# Altium PCB SOM_PCB_BLUETECHNIX.PcbDoc (part 6 of 8)
Units mil, origin at the board's own origin, x right, y up, seen from the top; angles counter-clockwise.
Board outline 1225 x 1620 mil, 8 copper layers (Top Layer, Int1 (Sign), Int2 (GND), Int3 (Sign), Int4 (Sign), Int5 (PWR), Int6 (Sign), Bottom Layer), stack 66.2 mil thick; 65 components, 201 nets, 938 pads, 497 vias.
Unrouted connection lines stored in the file: 25.
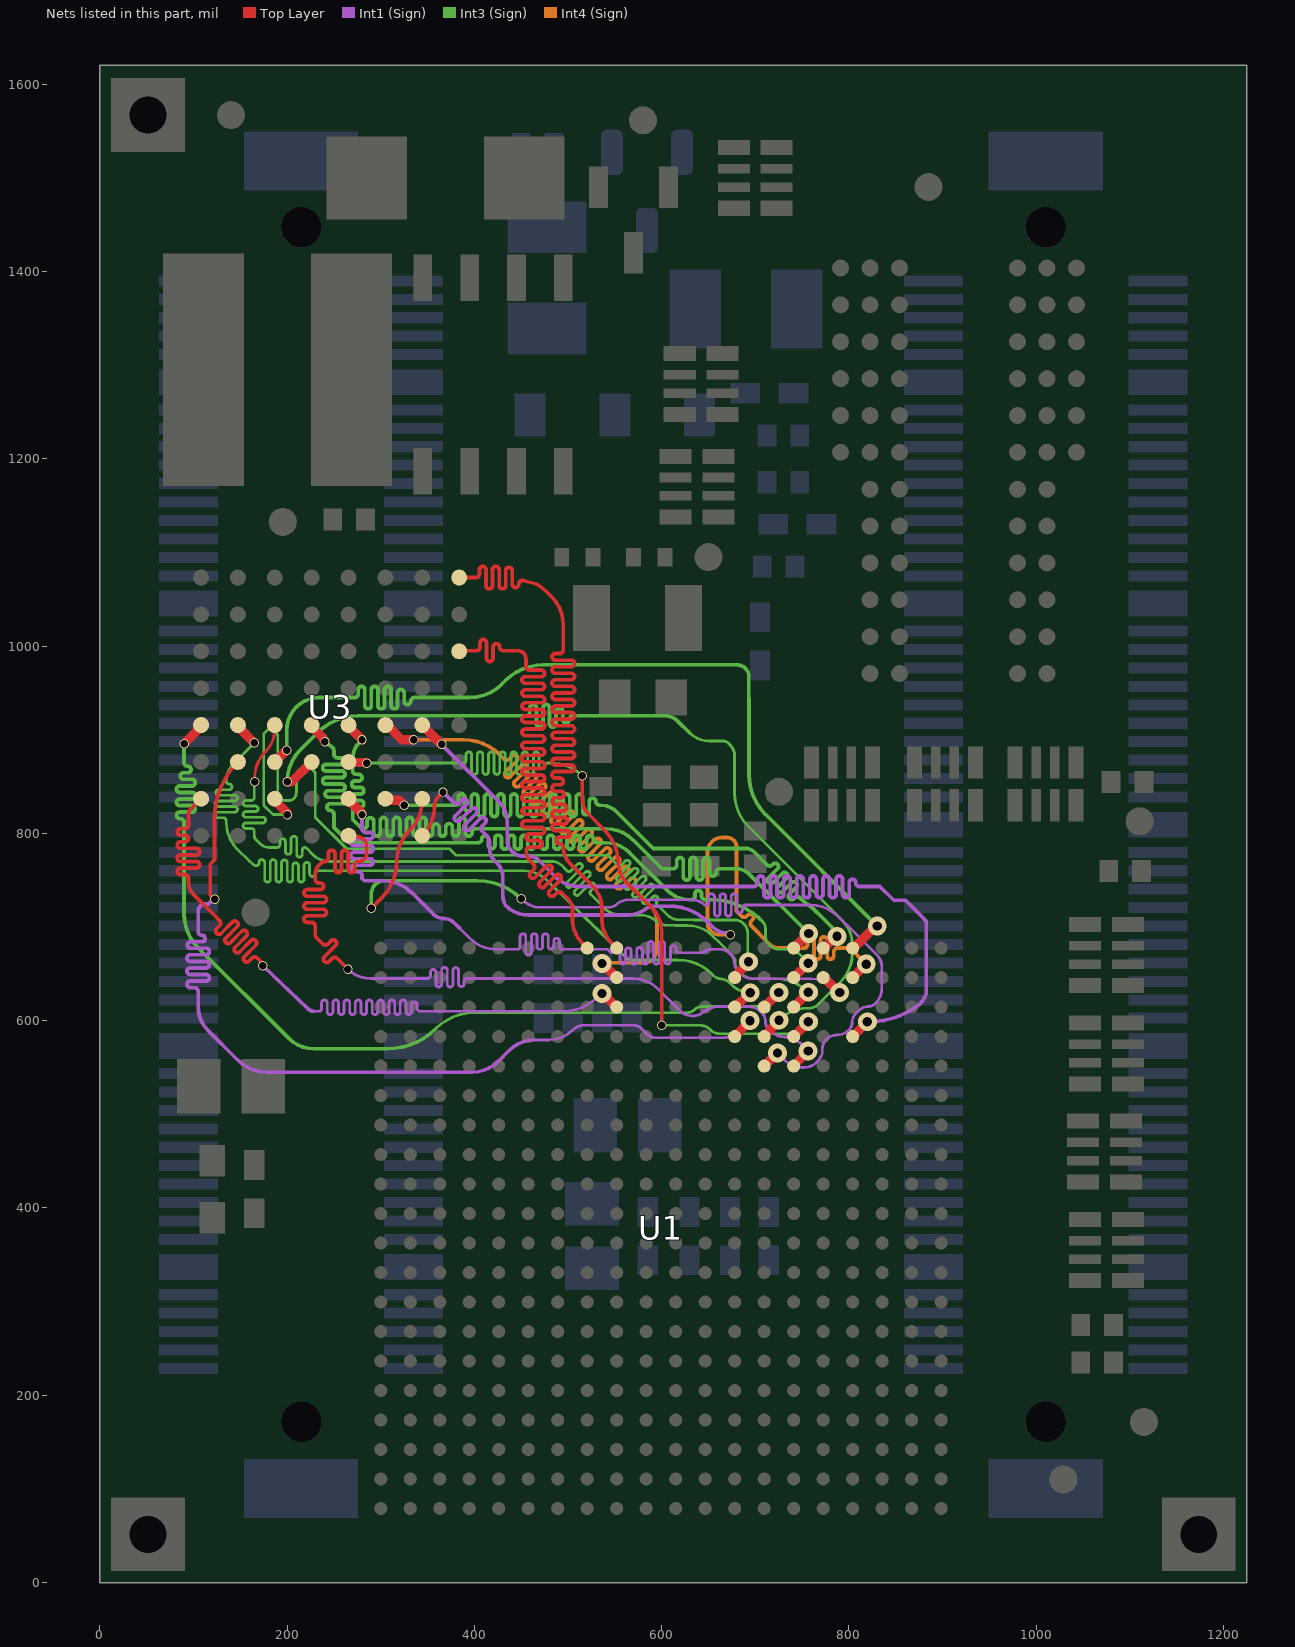
[diagram p11: the nets of this part, all layers, seen from the top]

## Via types
v1: diameter 20, hole 10, Top Layer to Int2 (GND), tented both sides, 68 vias
v2: diameter 10, hole 8, Top Layer to Int3 (Sign), tented both sides, 53 vias
v3: diameter 20, hole 10, Top Layer to Bottom Layer, tented both sides, 44 vias
v4: diameter 10, hole 8, Top Layer to Int1 (Sign), tented both sides, 41 vias
v5: diameter 20, hole 10, Top Layer to Int5 (PWR), tented both sides, 40 vias
v6: diameter 10, hole 8, Top Layer to Int4 (Sign), tented both sides, 33 vias
v7: diameter 20, hole 10, Top Layer to Int3 (Sign), tented both sides, 25 vias
v8: diameter 24, hole 12, Int6 (Sign) to Bottom Layer, tented both sides, 22 vias
v9: diameter 20, hole 10, Top Layer to Int4 (Sign), tented both sides, 19 vias
v10: diameter 24, hole 12, Int4 (Sign) to Bottom Layer, tented both sides, 17 vias
v11: diameter 24, hole 12, Int2 (GND) to Bottom Layer, tented both sides, 15 vias
v12: diameter 20, hole 10, Top Layer to Int1 (Sign), tented both sides, 13 vias
v13: diameter 24, hole 12, Top Layer to Int6 (Sign), tented both sides, 11 vias
v14: diameter 24, hole 12, Top Layer to Int4 (Sign), tented both sides, 10 vias
v15: diameter 24, hole 12, Top Layer to Int3 (Sign), tented both sides, 8 vias
v16: diameter 11, hole 8, Top Layer to Int1 (Sign), tented both sides, 8 vias
v17: diameter 10, hole 8, Top Layer to Bottom Layer, tented both sides, 7 vias
v18: diameter 20, hole 10, Top Layer to Int6 (Sign), tented both sides, 7 vias
v19: diameter 10, hole 8, Top Layer to Int6 (Sign), tented both sides, 6 vias
v20: diameter 10, hole 8, Int4 (Sign) to Bottom Layer, tented both sides, 6 vias
v21: diameter 24, hole 12, Int1 (Sign) to Bottom Layer, tented both sides, 5 vias
v22: diameter 24, hole 12, Top Layer to Int2 (GND), tented both sides, 5 vias
v23: diameter 10, hole 7, Top Layer to Int1 (Sign), tented both sides, 4 vias
v24: diameter 10, hole 8, Top Layer to Int2 (GND), tented both sides, 4 vias
v25: diameter 10, hole 8, Int2 (GND) to Bottom Layer, tented both sides, 4 vias
v26: diameter 24, hole 12, Int3 (Sign) to Bottom Layer, tented both sides, 4 vias
v27: diameter 24, hole 12, Top Layer to Bottom Layer, tented both sides, 4 vias
v28: diameter 10, hole 8, Int5 (PWR) to Bottom Layer, tented both sides, 3 vias
v29: diameter 20, hole 10, Int2 (GND) to Bottom Layer, tented both sides, 2 vias
v30: diameter 10, hole 8, Int6 (Sign) to Bottom Layer, tented both sides, 2 vias
v31: diameter 10, hole 8, Top Layer to Bottom Layer, 1 vias
v32: diameter 22, hole 12, Int2 (GND) to Bottom Layer, tented both sides, 1 vias
v33: diameter 24, hole 10, Int2 (GND) to Bottom Layer, tented both sides, 1 vias
v34: diameter 20, hole 12, Top Layer to Int5 (PWR), tented both sides, 1 vias
v35: diameter 20, hole 12, Top Layer to Int2 (GND), tented both sides, 1 vias
v36: diameter 24, hole 12, Top Layer to Int5 (PWR), tented both sides, 1 vias
v37: diameter 24, hole 12, Top Layer to Int1 (Sign), tented both sides, 1 vias

## Nets (pads, with @x,y where several pads share a name; then routed paths per layer and width w, separated by ;. In a path a pad name is that pad's centre, name@x,y a point inside that pad or via, vN(x,y) a via of type N, cw(c..) or ccw(c..) an arc to the next point about the centre after c; other vN are vias at no path point) (continued)
FLASH_A21: U1.A8 U3.C8 | length 1132.7
  Top Layer w4: U3.C8@386.23,991.88 U3.C8@383.74,994.37 384.37,995 400,995 402,995 ccw(c402,999) 406,999 406,1003.5 cw(c409.5,1003.5) 413,1003.5 413,986.96 ccw(c416.5,986.96) 420,986.96 420,999 cw(c423.5,999) 427,999 ccw(c431,999) 431,995 442.5,995 446.46,995 cw(c446.46,986.46) 452.49,992.51 cw(c446.46,986.46) 455,986.46 455,980.36 455,978.36 ccw(c459,978.36) 459,974.36 471.38,974.36 cw(c471.38,970.86) 471.38,967.36 454.38,967.36 ccw(c454.38,963.86) 454.38,960.36 471.38,960.36 cw(c471.38,956.86) 471.38,953.36 454.38,953.36 ccw(c454.38,949.86) 454.38,946.36 471.38,946.36 cw(c471.38,942.86) 471.38,939.36 454.38,939.36 ccw(c454.38,935.86) 454.38,932.36 471.38,932.36 cw(c471.38,928.86) 471.38,925.36 454.38,925.36 ccw(c454.38,921.86) 454.38,918.36 471.38,918.36 cw(c471.38,914.86) 471.38,911.36 454.38,911.36 ccw(c454.38,907.86) 454.38,904.36 471.38,904.36 cw(c471.38,900.86) 471.38,897.36 454.38,897.36 ccw(c454.38,893.86) 454.38,890.36 471.38,890.36 cw(c471.38,886.86) 471.38,883.36 454.38,883.36 ccw(c454.38,879.86) 454.38,876.36 471.38,876.36 cw(c471.38,872.86) 471.38,869.36 454.38,869.36 ccw(c454.38,865.86) 454.38,862.36 471.38,862.36 cw(c471.38,858.86) 471.38,855.36 454.38,855.36 ccw(c454.38,851.86) 454.38,848.36 471.38,848.36 cw(c471.38,844.86) 471.38,841.36 454.38,841.36 ccw(c454.38,837.86) 454.38,834.36 471.38,834.36 cw(c471.38,830.86) 471.38,827.36 454.38,827.36 ccw(c454.38,823.86) 454.38,820.36 471.38,820.36 cw(c471.38,816.86) 471.38,813.36 454.38,813.36 ccw(c454.38,809.86) 454.38,806.36 471.38,806.36 cw(c471.38,802.86) 471.38,799.36 458.5,799.36 ccw(c458.5,795.86) 458.5,792.36 469.08,792.36 cw(c469.08,788.86) 469.08,785.36 459.35,785.36 ccw(c459.35,781.36) 455.44,780.51 456.63,775.02 ccw(c473.26,782.56) 457.69,773.02 ccw(c473.26,782.56) 460.34,769.66 ; 457.52,772.48 460.34,769.66 ; U1.A8@520.51,677.48 515.02,682.98 cw(c539.77,707.73) 504.76,707.73 504.76,718.33 ccw(c488.1,718.33) 499.9,730.1 495,735 493.59,736.41 ccw(c490.76,733.59) 487.93,736.41 485.3,733.79 cw(c482.83,736.26) 480.35,733.79 cw(c482.83,736.26) 480.35,738.74 491.82,750.2 ccw(c489.34,752.68) 491.82,755.15 ccw(c489.34,752.68) 486.87,755.15 474.85,743.13 cw(c472.37,745.61) 469.9,743.13 cw(c472.37,745.61) 469.9,748.08 481.92,760.1 ccw(c479.44,762.58) 481.92,765.05 ccw(c479.44,762.58) 476.97,765.05 464.95,753.03 cw(c462.47,755.51) 460,753.03 cw(c462.47,755.51) 460,757.98 463.18,761.16 ccw(c460.35,763.99) 463.18,766.82 460.34,769.66
  Top Layer w10: U1.A8@520.4,677.48 U1.A8@520.51,677.48
FLASH_A22: U1.A9 U3.A8 | length 1124.9
  Top Layer w4: U3.A8@383.74,1073.11 399.43,1073.11 401.43,1073.11 ccw(c401.43,1077.11) 405.43,1077.11 405.43,1081.61 cw(c408.93,1081.61) 412.43,1081.61 412.43,1064.61 ccw(c415.93,1064.61) 419.43,1064.61 419.43,1081.61 cw(c422.93,1081.61) 426.43,1081.61 426.43,1064.61 ccw(c429.93,1064.61) 433.43,1064.61 433.43,1080.57 cw(c436.93,1080.57) 440.43,1080.57 440.43,1066.06 ccw(c443.93,1066.06) 447.43,1066.06 cw(c451.43,1066.06) 452.42,1069.93 465.38,1066.62 cw(c440,1020.26) 467.38,1065.47 cw(c440,1020.26) 477.37,1057.63 482.63,1052.37 cw(c452.75,1022.5) 495,1022.5 495,1005 495,996 cw(c491,996) 491,992 486.5,992 ccw(c486.5,988.5) 486.5,985 503.5,985 cw(c503.5,981.5) 503.5,978 486.5,978 ccw(c486.5,974.5) 486.5,971 503.5,971 cw(c503.5,967.5) 503.5,964 486.5,964 ccw(c486.5,960.5) 486.5,957 503.5,957 cw(c503.5,953.5) 503.5,950 486.5,950 ccw(c486.5,946.5) 486.5,943 503.5,943 cw(c503.5,939.5) 503.5,936 486.5,936 ccw(c486.5,932.5) 486.5,929 503.5,929 cw(c503.5,925.5) 503.5,922 486.5,922 ccw(c486.5,918.5) 486.5,915 503.5,915 cw(c503.5,911.5) 503.5,908 486.5,908 ccw(c486.5,904.5) 486.5,901 503.5,901 cw(c503.5,897.5) 503.5,894 486.5,894 ccw(c486.5,890.5) 486.5,887 503.5,887 cw(c503.5,883.5) 503.5,880 486.5,880 ccw(c486.5,876.5) 486.5,873 503.5,873 cw(c503.5,869.5) 503.5,866 486.5,866 ccw(c486.5,862.5) 486.5,859 491.5,859 cw(c491.5,855.5) 491.5,852 486.5,852 ccw(c486.5,848.5) 486.5,845 492.36,845 cw(c492.36,841.5) 492.36,838 486.5,838 ccw(c486.5,834.5) 486.5,831 495,831 cw(c495,827.5) 495,824 486.5,824 ccw(c486.5,820.5) 486.5,817 495.83,817 cw(c495.83,813.5) 495.83,810 486.5,810 ccw(c486.5,806.5) 486.5,803 498.54,803 cw(c498.54,799.5) 498.54,796 491,796 ccw(c491,792.5) 491,789 cw(c491,785) 495,785 ccw(c519.14,785) 502.06,767.94 514.97,755.03 526.56,743.44 cw(c503.09,720) 536.26,720 536.26,707.73 ccw(c571.27,707.73) 546.51,682.98 U1.A9@552.01,677.48
  Top Layer w10: U1.A9@551.89,677.48 U1.A9@552.01,677.48
FLASH_A23: U1.C9 U3.G1 | length 1107.7
  Top Layer w4: 100.17,734.83 cw(c113.54,748.17) 94.65,748.17 94.65,750 94.65,752 ccw(c90.65,752) 90.65,756 86.15,756 cw(c86.15,759.5) 86.15,763 103.15,763 ccw(c103.15,766.5) 103.15,770 86.15,770 cw(c86.15,773.5) 86.15,777 103.15,777 ccw(c103.15,780.5) 103.15,784 86.15,784 cw(c86.15,787.5) 86.15,791 91.15,791 ccw(c91.15,794.5) 91.15,798 86.15,798 cw(c86.15,801.5) 86.15,805 90.65,805 ccw(c90.65,809) 94.65,809 94.65,819.79 cw(c103.33,819.79) 97.19,825.93 U3.G1@108.15,836.89 ; 100.18,734.82 122.25,712.75 127.92,707.08 cw(c125.09,704.25) 127.92,701.42 124.74,698.24 ccw(c127.21,695.77) 124.74,693.29 ccw(c127.21,695.77) 129.69,693.29 141.71,705.31 cw(c144.18,702.84) 146.66,705.31 cw(c144.18,702.84) 146.66,700.36 134.64,688.34 ccw(c137.11,685.87) 134.64,683.39 ccw(c137.11,685.87) 139.59,683.39 151.61,695.41 cw(c154.08,692.94) 156.56,695.41 cw(c154.08,692.94) 156.56,690.46 144.54,678.44 ccw(c147.01,675.97) 144.54,673.49 ccw(c147.01,675.97) 149.49,673.49 161.51,685.51 cw(c163.98,683.04) 166.46,685.51 cw(c163.98,683.04) 166.46,680.56 154.44,668.54 ccw(c156.91,666.07) 154.44,663.59 ccw(c156.91,666.07) 159.39,663.59 162.57,666.78 ; 162.57,666.77 cw(c165.4,663.95) 168.22,666.77 ; 168.22,666.78 169.64,665.36 172.86,662.14 v4(173.96,658.55)
  Top Layer w10: v12(536.26,629) 536.88,629 551.39,614.49 U1.C9@552.01,614.49
  Int1 (Sign) w3: 228.69,610 232.38,610 233.88,610 ccw(c233.88,613) 236.88,613 236.88,619 cw(c239.88,619) 242.88,619 242.88,609.5 ccw(c245.88,609.5) 248.88,609.5 248.88,619 cw(c251.88,619) 254.88,619 254.88,609.5 ccw(c257.88,609.5) 260.88,609.5 260.88,619 cw(c263.88,619) 266.88,619 266.88,609.5 ccw(c269.88,609.5) 272.88,609.5 272.88,619 cw(c275.88,619) 278.88,619 278.88,609.5 ccw(c281.88,609.5) 284.88,609.5 284.88,619 cw(c287.88,619) 290.88,619 290.88,609.5 ccw(c293.88,609.5) 296.88,609.5 296.88,619 cw(c299.88,619) 302.88,619 302.88,609.5 ccw(c305.88,609.5) 308.88,609.5 308.88,619 cw(c311.88,619) 314.88,619 314.88,609.5 ccw(c317.88,609.5) 320.88,609.5 320.88,619 cw(c323.88,619) 326.88,619 326.88,609.5 ccw(c329.88,609.5) 332.88,609.5 332.88,617.09 cw(c335.88,617.09) 338.88,617.09 338.88,613 ccw(c341.88,613) 341.88,610 358.5,610 495,610 ccw(c495,660.76) 530.89,624.87 v12@535.02,629
  Int1 (Sign) w4: v4(173.96,658.55) 222.28,612.71 cw(c219.54,609.8) 222.39,612.61 ccw(c228.69,618.9) 228.69,610
FLASH_CLK: U1.B9 U3.E6 | length 1054.3
  Top Layer w10: U3.E6@305,915.63 306.89,915.63 322.52,900 v6(335,900) ; v9(536.25,661) U1.B9@552.01,645.98
  Int4 (Sign) w4: v6(335,900) 388.58,900 cw(c388.58,845.86) 426.86,884.14 430.2,880.8 431.62,879.38 ccw(c434.45,882.21) 437.28,879.38 440.46,882.56 cw(c442.93,880.09) 445.41,882.56 cw(c442.93,880.09) 445.41,877.61 433.39,865.59 ccw(c435.86,863.12) 433.39,860.64 ccw(c435.86,863.12) 438.34,860.64 450.36,872.66 cw(c452.83,870.19) 455.31,872.66 cw(c452.83,870.19) 455.31,867.72 443.29,855.69 ccw(c445.76,853.22) 443.29,850.74 ccw(c445.76,853.22) 448.24,850.74 460.26,862.77 cw(c462.73,860.29) 465.21,862.77 cw(c462.73,860.29) 465.21,857.82 453.19,845.79 ccw(c455.66,843.32) 453.19,840.85 ccw(c455.66,843.32) 458.14,840.84 470.16,852.87 cw(c472.63,850.39) 475.11,852.87 cw(c472.63,850.39) 475.11,847.92 463.09,835.9 ccw(c465.56,833.42) 463.09,830.95 ccw(c465.56,833.42) 468.03,830.95 480.06,842.97 cw(c482.53,840.49) 485.01,842.97 cw(c482.53,840.49) 485.01,838.02 472.98,826 ccw(c475.46,823.52) 472.98,821.05 ccw(c475.46,823.52) 477.93,821.05 489.96,833.07 cw(c492.43,830.59) 494.91,833.07 cw(c492.43,830.59) 494.91,828.12 482.88,816.1 ccw(c485.36,813.62) 482.88,811.15 ccw(c485.36,813.62) 487.83,811.15 499.85,823.17 cw(c502.33,820.69) 504.8,823.17 cw(c502.33,820.69) 504.8,818.22 492.78,806.2 ccw(c495.26,803.72) 492.78,801.25 ccw(c495.26,803.72) 497.73,801.25 509.75,813.27 cw(c512.23,810.79) 514.7,813.27 cw(c512.23,810.79) 514.7,808.32 502.68,796.3 ccw(c505.16,793.82) 502.68,791.35 ccw(c505.16,793.82) 507.63,791.35 519.65,803.37 cw(c522.13,800.89) 524.6,803.37 cw(c522.13,800.89) 524.6,798.42 512.58,786.4 ccw(c515.06,783.92) 512.58,781.45 ccw(c515.06,783.92) 517.53,781.45 529.55,793.47 cw(c532.03,790.99) 534.5,793.47 cw(c532.03,790.99) 534.5,788.52 522.48,776.5 ccw(c524.96,774.02) 522.48,771.55 ccw(c524.96,774.02) 527.43,771.55 539.45,783.57 cw(c541.93,781.09) 544.4,783.57 cw(c541.93,781.09) 544.4,778.62 532.38,766.6 ccw(c534.86,764.12) 532.38,761.65 ccw(c534.86,764.12) 537.33,761.65 549.35,773.67 cw(c551.83,771.2) 554.3,773.67 cw(c551.83,771.2) 554.3,768.72 542.28,756.7 ccw(c544.76,754.22) 542.28,751.75 ccw(c544.76,754.22) 547.23,751.75 559.25,763.77 cw(c561.73,761.3) 564.2,763.77 cw(c561.73,761.3) 564.2,758.82 552.18,746.8 ccw(c554.66,744.33) 552.18,741.85 ccw(c554.66,744.33) 557.13,741.85 566.57,751.29 cw(c569.05,748.82) 571.52,751.29 cw(c569.05,748.82) 571.52,746.34 570.92,745.74 ccw(c573.75,742.91) 570.92,740.08 587.76,723.25 589.36,721.47 cw(c570.19,705.72) 590.58,719.86 cw(c570.19,705.72) 595,705.72 595,677.07 cw(c577.93,677.07) 590,665 cw(c582.11,672.89) 582.11,661.73 538.55,661.73 v9(536.25,661)
FLASH_D0: U1.D13 U3.F2 | length 1110.5
  Top Layer w4: v4(122.57,729.47) 118,734.04 118,767.04 122.57,771.61 122.57,816.03 cw(c207.75,816.03) 129.94,850.69 cw(c207.75,816.03) U3.F2@147.5,876.24
  Top Layer w10: U1.D13@677.99,582.99 v12(694.3,600.05)
  Int1 (Sign) w3: 464.36,579.5 479.65,579.5 ccw(c479.65,615.35) 480.23,579.5 ccw(c479.65,615.35) 492.14,581.74 ccw(c479.65,615.35) 505,590 cw(c517.07,577.93) 517.07,595 570,595 cw(c570,582.93) 578.54,591.46 585,585 ccw(c592.86,592.86) 592.86,581.74 663.99,581.74 ccw(c663.99,610.11) 684.04,590.04 v12(694.3,600.05)
  Int1 (Sign) w4: v4(122.57,729.47) 120.95,729.47 116.09,724.61 112.88,724.61 ccw(c112.88,716.74) 107.32,722.32 ccw(c112.88,716.74) 105,716.74 105,701.84 105,695.25 ccw(c109,695.25) 109,691.25 cw(c109,687.75) 109,684.25 97.05,684.25 ccw(c97.05,680.75) 97.05,677.25 113.5,677.25 cw(c113.5,673.75) 113.5,670.25 96.5,670.25 ccw(c96.5,666.75) 96.5,663.25 113.5,663.25 cw(c113.5,659.75) 113.5,656.25 96.5,656.25 ccw(c96.5,652.75) 96.5,649.25 113.5,649.25 cw(c113.5,645.75) 113.5,642.25 96.5,642.25 ccw(c96.5,638.75) 96.5,635.25 101,635.25 cw(c101,631.25) 105,631.25 105,629.25 105,615 ccw(c140.89,615) 115.51,589.62 146.79,558.35 ccw(c179.01,590.57) 179.01,545 397.54,545 ccw(c397.54,584.75) 425.65,556.64 437.29,568.28 cw(c464.36,541.21) 464.36,579.5
FLASH_D1: U1.C13 U3.E2 | length 1071
  Top Layer w10: U3.E2@147.52,915.63 147.52,914.06 v2(165,896.57) ; U1.C13@677.99,614.49 678.62,614.49 694,629.86 v7(694.63,629.86)
  Int3 (Sign) w3: 159.17,770.83 147.09,782.91 cw(c176.27,812.09) 135,812.09 135,813.61 ccw(c132,813.61) 132,816.61 126,816.61 cw(c126,819.61) 126,822.61 144,822.61 ccw(c144,825.61) 144,828.61 126,828.61 cw(c126,831.61) 126,834.61 144,834.61 ccw(c144,837.61) 144,840.61 127.11,840.61 cw(c127.11,843.61) 127.11,846.61 138.09,846.61 ccw(c138.09,849.61) 138.09,852.61 cw(c138.09,855.61) 135.11,855.96 135.75,861.43 cw(c162.94,855) 136.15,862.93 cw(c162.94,855) 143.18,874.76 v2(165,896.57) ; 159.19,770.81 ccw(c185.31,796.97) 163.58,767.06 ccw(c185.31,796.97) 164.08,766.7 ccw(c185.31,796.97) 165.58,765.71 166.25,765.51 ccw(c167.08,768.4) 170.08,768.4 170.08,769 cw(c173.08,769) 176.08,769 176.08,751 ccw(c179.08,751) 182.08,751 182.08,769 cw(c185.08,769) 188.08,769 188.08,751 ccw(c191.08,751) 194.08,751 194.08,768.62 cw(c197.08,768.62) 200.08,768.62 200.08,751 ccw(c203.08,751) 206.08,751 206.08,765.55 cw(c209.08,765.55) 212.08,765.55 212.08,751 ccw(c215.08,751) 218.08,751 218.08,765.95 cw(c221.08,765.95) 224.08,765.95 224.08,757 ccw(c227.08,757) 230.08,757 cw(c233.08,757) 233.08,760 239.52,760 453.2,760 cw(c453.2,726.16) 468.19,756.5 cw(c453.2,726.16) 477.13,750.09 477.17,750.04 537.12,691.72 538.6,690.23 ccw(c583.06,734.7) 540.71,688.23 ; 540.71,688.22 cw(c538.71,685.99) 540.82,688.12 543.17,685.83 cw(c536.57,679) 543.23,685.77 561.87,667.55 ccw(c568.52,674.34) 567.4,664.91 617.32,664.91 cw(c617.32,613.63) 653.56,649.9 655.18,648.28 ccw(c664,657.1) 660.89,645.02 ccw(c664,657.1) 663.82,644.63 cw(c663.74,641.63) 664.17,644.6 664.25,644.59 cw(c663.85,641.62) 664.51,644.54 ; 664.55,644.53 665.79,644.22 cw(c662.24,630.16) 671.38,641.41 672.24,640.72 cw(c670.37,638.38) 672.49,640.49 674.98,638 ccw(c694.63,657.65) v7(694.63,629.86)
FLASH_D2: U1.B13 U3.G3 | length 1071.2
  Top Layer w10: U3.G3@186.89,836.89 186.89,835 200.38,821.51 v2(200.38,820) ; U1.B13@677.99,645.98 677.99,647.01 692.73,661.75 v7(692.73,662.77)
  Int3 (Sign) w3: v2(200.38,820) 185,820 175,830 175,906.16 179.79,910.95 184.2,910.95 190,905.15 190,843.54 ccw(c198.54,843.54) 192.49,837.51 ccw(c198.54,843.54) 198.54,835 201.77,835 ccw(c201.77,842.8) 207.29,837.29 ccw(c200.73,843.84) 210,843.84 210,861.46 cw(c218.54,861.46) 212.49,867.49 cw(c218.54,861.46) 218.54,870 221.46,870 cw(c221.46,861.46) 227.49,867.51 228.75,866.25 cw(c225.73,863.23) 230,863.23 230,817.17 263.67,783.5 373.42,783.5 380.35,776.57 542.5,776.57 551.71,767.36 552.77,766.3 ccw(c554.89,768.42) 557.01,766.3 561.14,770.43 cw(c563.26,768.31) 565.38,770.43 cw(c563.26,768.31) 565.38,766.18 552.77,753.57 ccw(c554.89,751.45) 552.77,749.33 ccw(c554.89,751.45) 557.01,749.33 569.62,761.94 cw(c571.74,759.82) 573.87,761.94 cw(c571.74,759.82) 573.87,757.7 561.26,745.09 ccw(c563.38,742.97) 561.26,740.85 ccw(c563.38,742.97) 565.5,740.85 578.11,753.46 cw(c580.23,751.34) 582.35,753.46 cw(c580.23,751.34) 582.35,749.21 569.74,736.6 ccw(c571.86,734.48) 569.74,732.36 ccw(c571.86,734.48) 573.98,732.36 586.59,744.97 cw(c588.71,742.85) 590.84,744.97 cw(c588.71,742.85) 590.84,740.73 580.09,729.99 ccw(c582.21,727.87) 580.09,725.74 ccw(c582.21,727.87) 584.34,725.74 590.95,732.36 cw(c593.08,730.24) 595.2,732.36 cw(c593.08,730.24) 595.2,728.12 ccw(c597.32,726) 595.2,723.88 599.3,719.78 600.36,718.72 606.31,712.77 ccw(c618.2,724.66) 618.2,707.84 629.63,707.84 cw(c627.19,635.62) 634.43,707.52 677.81,707.52 cw(c677.81,693.49) 691.84,693.49 691.84,663.66 ccw(c692.73,663.66) v7(692.73,662.77)
FLASH_D3: U1.B15 U3.E4 | length 1070.9
  Top Layer w10: U3.E4@226.26,915.63 226.26,913.74 237.97,902.03 v2(240.45,897.92) ; U1.B15@740.98,645.98 v7(756.49,661.33)
  Int3 (Sign) w3: 706.38,707.12 707.83,705.67 cw(c700.82,698.66) 710.74,698.66 710.74,690.82 ccw(c725.39,690.82) 715.03,680.46 ccw(c725.39,690.82) 725.39,676.17 733.84,676.17 cw(c733.84,655.75) 748.26,670.2 ; 748.28,670.19 755.69,662.78 v7(756.49,661.33)
  Int3 (Sign) w4: v2(240.45,897.92) 248.48,891.48 cw(c246,888.34) 250,888.34 250,886.59 250,884.59 ccw(c254,884.59) 254,880.59 258.5,880.59 cw(c258.5,877.09) 258.5,873.59 241.5,873.59 ccw(c241.5,870.09) 241.5,866.59 258.5,866.59 cw(c258.5,863.09) 258.5,859.59 241.5,859.59 ccw(c241.5,856.09) 241.5,852.59 258.5,852.59 cw(c258.5,849.09) 258.5,845.59 244.07,845.59 ccw(c244.07,842.09) 244.07,838.59 258.5,838.59 cw(c258.5,835.09) 258.5,831.59 246,831.59 ccw(c246,828.09) 246,824.59 cw(c246,820.59) 250,820.59 250,806.36 266.38,790 396.23,790 403.92,790 ccw(c403.92,794) 407.92,794 cw(c411.42,794) 414.92,794 414.92,787.3 ccw(c418.42,787.3) 421.92,787.3 421.92,794.5 cw(c425.42,794.5) 428.92,794.5 428.92,786.57 ccw(c432.42,786.57) 435.92,786.57 435.92,794.5 cw(c439.42,794.5) 442.92,794.5 442.92,786.57 ccw(c446.42,786.57) 449.92,786.57 449.92,794.5 cw(c453.42,794.5) 456.92,794.5 456.92,786.57 ccw(c460.42,786.57) 463.92,786.57 463.92,794.5 cw(c467.42,794.5) 470.92,794.5 470.92,786.57 ccw(c474.42,786.57) 477.92,786.57 477.92,794.5 cw(c481.42,794.5) 484.92,794.5 484.92,786.57 ccw(c488.42,786.57) 491.92,786.57 491.92,794.5 cw(c495.42,794.5) 498.92,794.5 498.92,786.57 ccw(c502.42,786.57) 505.92,786.57 505.92,794.5 cw(c509.42,794.5) 512.92,794.5 512.92,786.57 ccw(c516.42,786.57) 519.92,786.57 519.92,794.5 cw(c523.42,794.5) 526.92,794.5 526.92,794 ccw(c530.92,794) 530.92,790 539.92,790 540,790 cw(c540,753.79) 565.61,779.39 605.58,739.42 ccw(c630.61,764.45) 629.63,729.07 ccw(c630.61,764.45) 630.61,729.05 631.63,729.05 ccw(c631.63,733.05) 635.63,733.05 635.63,735.4 cw(c639.13,735.4) 642.63,735.4 642.63,733.05 ccw(c646.63,733.05) 646.63,729.05 653.43,729.05 666.26,727.95 cw(c653.43,654.17) 668.26,727.57 cw(c653.43,654.17) 703.31,710.02 cw(c653.43,654.17) 706.34,707.16
FLASH_D4: U1.A15 U3.E5 | length 1075
  Top Layer w10: U3.E5@265.63,915.63 265.63,914.37 v2(280,900) ; U1.A15@740.98,677.48 741.23,677.48 756.75,693 v7(757,693)
  Int3 (Sign) w4: v2(280,900) 277.65,897.65 ccw(c296.1,879.19) 270,879.19 270,867 ccw(c274,867) 274,863 276.5,863 cw(c276.5,859.5) 276.5,856 272.5,856 ccw(c272.5,852.5) 272.5,849 278.5,849 cw(c278.5,845.5) 278.5,842 272.5,842 ccw(c272.5,838.5) 272.5,835 278.5,835 cw(c278.5,831.5) 278.5,828 274,828 ccw(c274,824) 270,824 270,815 274.34,810.66 280,805 281.46,805 ccw(c281.46,809) 285.46,809 285.46,813.15 cw(c288.96,813.15) 292.46,813.15 292.46,800.5 ccw(c295.96,800.5) 299.46,800.5 299.46,813.5 cw(c302.96,813.5) 306.46,813.5 306.46,800.5 ccw(c309.96,800.5) 313.46,800.5 313.46,813.5 cw(c316.96,813.5) 320.46,813.5 320.46,800.5 ccw(c323.96,800.5) 327.46,800.5 327.46,813.5 cw(c330.96,813.5) 334.46,813.5 334.46,800.5 ccw(c337.96,800.5) 341.46,800.5 341.46,813.5 cw(c344.96,813.5) 348.46,813.5 348.46,800.5 ccw(c351.96,800.5) 355.46,800.5 355.46,806.5 cw(c358.96,806.5) 362.46,806.5 362.46,800.5 ccw(c365.96,800.5) 369.46,800.5 369.46,806.81 cw(c372.96,806.81) 376.46,806.81 376.46,800.5 ccw(c379.96,800.5) 383.46,800.5 383.46,813.5 cw(c386.96,813.5) 390.46,813.5 390.46,800.5 ccw(c393.96,800.5) 397.46,800.5 397.46,801 cw(c401.46,801) 401.46,805 417.46,805 540,805 cw(c540,762.75) 569.87,792.63 600.31,762.19 610.16,762.19 612.16,762.19 ccw(c612.16,766.19) 616.16,766.19 616.16,770.69 cw(c619.66,770.69) 623.16,770.69 623.16,753.69 ccw(c626.66,753.69) 630.16,753.69 630.16,770.69 cw(c633.66,770.69) 637.16,770.69 637.16,753.69 ccw(c640.66,753.69) 644.16,753.69 644.16,770.69 cw(c647.66,770.69) 651.16,770.69 651.16,757.89 ccw(c654.66,757.89) 658.16,757.89 658.16,758.19 cw(c662.16,758.19) 662.16,762.19 679.68,762.19 680,762.19 cw(c680,743.32) 693.33,756.67 v7(757,693)
FLASH_D5: U1.B16 U3.G5 | length 1113.5
  Top Layer w3: v12@789.23,630 v12(790,630)
  Top Layer w4: U3.G5@265.63,835.63 U3.G5@265.63,836.89 ; v4(280,820) v4@280,821.26
  Top Layer w10: U3.G5@265.63,835.63 v4@280,821.26 ; U1.B16@772.48,645.98 cw(c772.48,644.13) 773.79,645.44 v12@789.23,630
  Int1 (Sign) w3: 384,699 395.38,687.62 ccw(c422.86,715.1) 422.86,676.23 444.36,676.23 445.86,676.23 ccw(c445.86,679.23) 448.86,679.23 448.86,689.88 cw(c451.86,689.88) 454.86,689.88 454.86,672.83 ccw(c457.86,672.83) 460.86,672.83 460.86,689.88 cw(c463.86,689.88) 466.86,689.88 466.86,679.23 ccw(c469.86,679.23) 472.86,679.23 472.86,689.88 cw(c475.86,689.88) 478.86,689.88 478.86,679.23 ccw(c481.86,679.23) 484.86,679.23 484.86,685.01 cw(c487.86,685.01) 490.86,685.01 490.86,679.23 ccw(c493.86,679.23) 493.86,676.23 504.61,676.23 542.27,676.23 546,672.5 546.4,672.5 ccw(c546.4,675.5) 549.4,675.5 549.4,680.14 cw(c552.4,680.14) 555.4,680.14 555.4,663.5 ccw(c558.4,663.5) 561.4,663.5 561.4,674.76 cw(c564.4,674.76) 567.4,674.76 567.4,663.5 ccw(c570.4,663.5) 573.4,663.5 573.4,675.36 cw(c576.4,675.36) 579.4,675.36 579.4,663.5 ccw(c582.4,663.5) 585.4,663.5 585.4,681.5 cw(c588.4,681.5) 591.4,681.5 591.4,663.5 ccw(c594.4,663.5) 597.4,663.5 597.4,681.5 cw(c600.4,681.5) 603.4,681.5 603.4,663.5 ccw(c606.4,663.5) 609.4,663.5 609.4,677 cw(c612.4,677) 615.4,677 615.4,675.5 ccw(c618.4,675.5) 618.4,672.5 621.78,672.5 625.16,672.5 641.25,672.5 ccw(c641.25,682.73) 644.15,672.92 ; 648.48,675.5 cw(c641.25,682.73) 644.15,672.92 ; v12(790,630) 786.06,633.94 ccw(c760,607.89) 760,644.74 696.92,644.74 cw(c696.92,660.8) 685.56,649.44 680.85,654.15 cw(c688.95,662.24) 677.5,662.24 ccw(c666.05,662.24) 674.15,670.33 ccw(c659.91,656.1) 673.36,671.08 cw(c675.36,673.31) 673.11,671.33 ccw(c662.24,661.73) 672.53,671.95 ccw(c662.24,661.73) 672.47,672.02 ccw(c662.24,661.73) 662.24,676.23 ccw(c662.24,661.73) 661.35,676.2 cw(c661.16,679.2) 661,676.2 652.65,676.2 ccw(c652.65,663.56) 644.15,672.92
  Int1 (Sign) w4: v4(280,820) 280,813.28 280,804.99 ccw(c284,804.99) 284,800.99 288.5,800.99 cw(c288.5,797.49) 288.5,793.99 271.5,793.99 ccw(c271.5,790.49) 271.5,786.99 288.5,786.99 cw(c288.5,783.49) 288.5,779.99 271.5,779.99 ccw(c271.5,776.49) 271.5,772.99 288.5,772.99 cw(c288.5,769.49) 288.5,765.99 271.5,765.99 ccw(c271.5,762.49) 271.5,758.99 276,758.99 cw(c276,754.99) 280,754.99 280,754.61 280,752.99 280,751.84 282.34,749.5 301.42,749.5 cw(c301.42,703.44) 333.97,736.03 ; 333.99,736.01 356.41,713.59 ccw(c367.5,724.69) 367.5,709 cw(c367.5,693.31) 378.59,704.41 384,699
FLASH_D6: U1.A16 U3.G6 | length 1071.2
  Top Layer w10: U3.G6@305,836.89 306.34,835.55 319.45,835.55 v2(325,830) ; U1.A16@772.48,677.48 773.56,677.48 783.75,687.67 v7(787.31,689.96)
  Int3 (Sign) w4: v2(325,830) 376.74,830 378.74,830 ccw(c378.74,834) 382.74,834 382.74,838.5 cw(c386.24,838.5) 389.74,838.5 389.74,827.26 ccw(c393.24,827.26) 396.74,827.26 396.74,838.5 cw(c400.24,838.5) 403.74,838.5 403.74,821.5 ccw(c407.24,821.5) 410.74,821.5 410.74,838.5 cw(c414.24,838.5) 417.74,838.5 417.74,821.5 ccw(c421.24,821.5) 424.74,821.5 424.74,838.5 cw(c428.24,838.5) 431.74,838.5 431.74,821.5 ccw(c435.24,821.5) 438.74,821.5 438.74,838.5 cw(c442.24,838.5) 445.74,838.5 445.74,821.5 ccw(c449.24,821.5) 452.74,821.5 452.74,838.5 cw(c456.24,838.5) 459.74,838.5 459.74,821.5 ccw(c463.24,821.5) 466.74,821.5 466.74,838.5 cw(c470.24,838.5) 473.74,838.5 473.74,821.5 ccw(c477.24,821.5) 480.74,821.5 480.74,838.5 cw(c484.24,838.5) 487.74,838.5 487.74,821.5 ccw(c491.24,821.5) 494.74,821.5 494.74,838.5 cw(c498.24,838.5) 501.74,838.5 501.74,821.5 ccw(c505.24,821.5) 508.74,821.5 508.74,838.5 cw(c512.24,838.5) 515.74,838.5 515.74,823.39 ccw(c519.24,823.39) 522.74,823.39 522.74,834 cw(c526.24,834) 529.74,834 ccw(c533.74,834) 533.74,830 535,830 540.5,829.37 cw(c535,805.86) 542.5,828.81 cw(c535,805.86) 552.06,822.94 591.04,783.96 689.24,783.96 cw(c689.24,770.43) 698.8,780 711.02,767.78 712.44,766.37 ccw(c715.27,769.2) 718.09,766.37 718.79,767.07 cw(c721.27,764.59) 723.74,767.07 cw(c721.27,764.59) 723.74,762.12 714.21,752.58 ccw(c716.68,750.11) 714.21,747.63 ccw(c716.68,750.11) 719.16,747.63 728.69,757.17 cw(c731.17,754.69) 733.64,757.17 cw(c731.17,754.69) 733.64,752.22 724.11,742.68 ccw(c726.58,740.21) 724.11,737.73 ccw(c726.58,740.21) 729.05,737.73 738.59,747.27 cw(c741.07,744.79) 743.54,747.27 cw(c741.07,744.79) 743.54,742.32 736.41,735.19 ccw(c738.89,732.71) 736.41,730.24 ccw(c738.89,732.71) 741.36,730.24 742.14,731.01 cw(c744.96,728.19) 747.79,731.01 748.73,730.08 761.02,720.44 773.22,708.23 774.64,706.82 787.87,693.58 787.77,693.48 787.77,691.82 v7(787.31,689.96)
FLASH_D7: U1.B17 U3.H7 | length 1056.6
  Top Layer w4: U3.H7@344.37,797.52 ccw(c312.86,829.02) 354.97,814.46 ccw(c312.86,829.02) 357.42,829.02 cw(c372.05,829.02) 357.46,830.11 cw(c372.05,829.02) 361.7,839.37 v6(366.5,844.16)
  Top Layer w10: U1.B17@803.98,645.98 v9(818.39,660.4)
  Int1 (Sign) w4: v6(366.5,844.16) 376.54,834.11 377.96,832.7 ccw(c380.79,835.53) 383.61,832.7 386.8,835.88 cw(c389.27,833.41) 391.75,835.88 cw(c389.27,833.41) 391.75,830.93 379.72,818.91 ccw(c382.2,816.44) 379.73,813.96 ccw(c382.2,816.44) 384.67,813.96 396.7,825.98 cw(c399.17,823.51) 401.65,825.98 cw(c399.17,823.51) 401.65,821.03 389.62,809.01 ccw(c392.1,806.54) 389.62,804.06 ccw(c392.1,806.54) 394.57,804.06 406.6,816.08 cw(c409.07,813.61) 411.54,816.08 cw(c409.07,813.61) 411.54,811.13 408.36,807.95 ccw(c411.19,805.12) 408.36,802.29 411.99,798.66 413.36,797.29 cw(c406.72,790.65) 413.41,797.25 cw(c406.72,790.65) 416.11,790.65 416.11,784.63 ccw(c436.6,784.63) 422.11,770.14 424.44,767.82 cw(c410.53,753.9) 430.2,753.9 430.2,734.73 ccw(c454.2,734.73) 433.4,722.77 ccw(c457.54,746.91) 457.54,712.77 563.09,712.77 ccw(c563.09,746.91) 580.88,717.77 ; v6(673.28,691.72) 671.74,693.26 cw(c671.74,718.76) 653.72,700.73 648.9,705.54 ccw(c608.51,665.16) 627.97,718.86 ccw(c608.51,665.16) 608.51,722.27 591.76,722.27 ccw(c591.76,706.89) 584.96,720.69 ; 580.88,717.77 ccw(c563.09,746.91) 584.96,720.69 ; 580.88,717.77 cw(c591.76,706.89) 584.96,720.69
  Int4 (Sign) w4: v6(673.28,691.72) 661.74,691.72 cw(c661.74,704.53) 648.93,704.53 648.93,780 cw(c664.41,780) 649.36,783.61 cw(c664.41,780) 650.26,786.27 cw(c664.41,780) 664.41,795.47 670,795.47 cw(c670,785.47) 680,785.47 680,716.8 683.84,712.97 685.25,711.55 ccw(c688.08,714.38) 690.91,711.55 692.14,712.79 cw(c694.62,710.31) 697.09,712.79 cw(c694.62,710.31) 697.09,707.84 695.86,706.6 ccw(c698.69,703.77) 695.86,700.95 712.05,684.75 714.46,682.34 ccw(c726.2,694.08) 726.2,677.48 749.73,677.48 751.73,677.48 ccw(c751.73,681.48) 755.73,681.48 755.73,685.98 cw(c759.23,685.98) 762.73,685.98 762.73,668.98 ccw(c766.23,668.98) 769.73,668.98 769.73,685.98 cw(c773.23,685.98) 776.73,685.98 776.73,668.98 ccw(c780.23,668.98) 783.73,668.98 783.73,673.48 cw(c787.73,673.48) 787.73,677.48 795.14,677.48 801.31,677.48 816.14,662.65 816.14,660.4 v9(818.39,660.4)
FLASH_D8: U1.C14 U3.E1 | length 1057
  Top Layer w10: v2(90,895.63) 108.15,913.78 U3.E1@108.15,915.63 ; U1.C14@709.49,614.49 v7(725.22,630.06)
  Int3 (Sign) w3: 358.62,591.33 cw(c400.08,549.87) 400.08,608.5 627.16,608.5 ccw(c627.16,619.6) 635,611.75 cw(c642.85,603.9) 642.85,615 700,615 ccw(c700,639.33) 716.83,621.76 ccw(c700,639.33) 717.21,622.13 717.61,622.53
  Int3 (Sign) w4: v2(90,895.63) 90,885 90,875.69 ccw(c94,875.69) 94,871.69 cw(c94,868.19) 94,864.69 89.36,864.69 ccw(c89.36,861.19) 89.36,857.69 98.5,857.69 cw(c98.5,854.19) 98.5,850.69 85.5,850.69 ccw(c85.5,847.19) 85.5,843.69 98.5,843.69 cw(c98.5,840.19) 98.5,836.69 85.5,836.69 ccw(c85.5,833.19) 85.5,829.69 98.5,829.69 cw(c98.5,826.19) 98.5,822.69 85.5,822.69 ccw(c85.5,819.19) 85.5,815.69 86,815.69 cw(c86,811.69) 90,811.69 90,809.68 90,714.14 ccw(c141.25,714.14) 104.98,677.94 201.91,581 ; 201.94,580.97 ccw(c228.47,607.56) 228.47,570 307.13,570 ccw(c307.13,642.82) 345.62,581 ccw(c307.13,642.82) 358.62,591.33
FLASH_D9: U1.C15 U3.E3 | length 1074.9
  Top Layer w3: v2(165.5,855) 165.5,860.38 cw(c202.01,860.38) 176.19,886.19 ccw(c150.38,912.01) 186.89,912.01 U3.E3@186.89,915.63
  Top Layer w10: U1.C15@740.98,614.49 v7(756.73,630.24)
  Int3 (Sign) w3: v2(165.5,855) 165,854.5 165,845 165,838.22 cw(c162,838.22) 162,835.22 156,835.22 ccw(c156,832.22) 156,829.22 166.05,829.22 cw(c166.05,826.22) 166.05,823.22 156,823.22 ccw(c156,820.22) 156,817.22 174,817.22 cw(c174,814.22) 174,811.22 156,811.22 ccw(c156,808.22) 156,805.22 162,805.22 cw(c162,802.22) 165,802.22 165,800.72 165,797.86 ccw(c171.9,797.86) 167.02,792.98 171.01,788.99 ccw(c180.64,798.62) 180.64,785 183.09,785 189.29,785 ccw(c189.29,788) 192.29,788 192.29,791.31 cw(c195.29,791.31) 198.29,791.31 198.29,780.62 ccw(c201.29,780.62) 204.29,780.62 204.29,794 cw(c207.29,794) 210.29,794 210.29,777.55 ccw(c213.29,777.55) 216.29,777.55 216.29,782 cw(c219.29,782) 219.29,785 220,785 220.8,784.2 227.93,777.07 ccw(c245,794.14) 245,770 482.76,770 cw(c482.76,754.85) 493.46,765.58 ; 493.47,765.56 497.91,761.13 498.97,760.07 ccw(c501.09,762.19) 503.21,760.07 510.25,767.1 cw(c512.37,764.98) 514.49,767.1 cw(c512.37,764.98) 514.49,762.86 498.97,747.34 ccw(c501.09,745.22) 498.97,743.1 ccw(c501.09,745.22) 503.21,743.1 518.73,758.61 cw(c520.85,756.49) 522.97,758.61 cw(c520.85,756.49) 522.97,754.37 507.46,738.85 ccw(c509.58,736.73) 507.46,734.61 ccw(c509.58,736.73) 511.7,734.61 523.34,746.25 cw(c525.46,744.13) 527.59,746.25 cw(c525.46,744.13) 527.59,742.01 524.43,738.85 ccw(c526.55,736.73) 524.43,734.61 527.67,731.37 528.73,730.31 536.13,722.91 536.29,722.75 540.6,718.44 540.94,718.1 541.13,717.91 ccw(c557.6,741.72) 557.6,712.77 ; 557.63,712.77 577.41,712.77 cw(c577.41,687.98) 591.92,708.08 cw(c560,675.65) 592.18,707.82 ccw(c606.75,722.4) 606.22,701.79 ccw(c606.75,722.4) 606.75,701.79 614.18,701.69 627.55,701.69 cw(c627.55,663.64) 654.45,690.55 662.16,682.84 673.91,671.09 cw(c656.84,654.02) 677.92,665.78 cw(c675.3,664.32) 678.29,664.06 ccw(c692.73,662.77) 680.98,654.28 cw(c656.84,654.02) 680.98,654.02 683.88,651.12 ccw(c699.3,666.55) 699.3,644.74 721.73,644.74 cw(c721.73,595.23) v7(756.73,630.24)
FLASH_D10: U1.A17 U3.F3 | length 1074.9
  Top Layer w10: U3.F3@186.89,876.26 v2(199.55,888.92) ; U1.A17@803.98,677.48 805.06,677.48 828.6,701.03 v7(830.09,701.03)
  Int3 (Sign) w4: v2(199.55,888.92) 199.55,909.78 cw(c235.22,909.78) 210,935 cw(c234.14,910.86) 234.14,945 270,945 272,945 ccw(c272,949) 276,949 276,953.5 cw(c279.5,953.5) 283,953.5 283,936.5 ccw(c286.5,936.5) 290,936.5 290,953.5 cw(c293.5,953.5) 297,953.5 297,936.5 ccw(c300.5,936.5) 304,936.5 304,953.5 cw(c307.5,953.5) 311,953.5 311,936.5 ccw(c314.5,936.5) 318,936.5 318,950.18 cw(c321.5,950.18) 325,950.18 325,941 ccw(c328.5,941) 332,941 cw(c336,941) 336,945 351.19,945 395,945 ccw(c395,993.25) 429.12,959.13 433.04,963.06 cw(c473.95,922.16) 473.95,980 680.34,980 cw(c680.34,967.29) 693.05,967.29 693.05,943.78 693.19,943.78 693.19,863.27 ccw(c754.38,863.27) 711.11,820 v7(830.09,701.03)
FLASH_D11: U1.D14 U3.F4 | length 1070.7
  Top Layer w10: v2(200,855) 205,855 U3.F4@226.26,876.26 ; U1.D14@709.49,582.99 709.49,583.87 725.24,599.62 v7(725.24,600.5)
  Int3 (Sign) w3: 629.63,907.37 ccw(c650.79,928.53) 650.79,898.61 665.57,898.61 cw(c665.57,890.82) 671.07,896.34 ; 671.08,896.33 673.36,894.04 cw(c662.35,883.03) 677.92,883.03 677.93,843.02 ccw(c728.48,843.02) 692.7,807.3 ; 692.73,807.27 792.64,707.36 cw(c765.48,680.2) 803.89,680.2 803.89,673.53 cw(c756.47,673.53) 790,640 767.66,617.66 cw(c756.98,628.35) 756.98,613.24 755.99,613.24 ccw(c755.99,569.74) 750.36,612.87 ccw(c755.99,569.74) 727.09,602.25 ccw(c755.99,569.74) v7@725.26,600.52
  Int3 (Sign) w4: v2(200,855) cw(c248.28,855) 214.12,889.12 ; 214.14,889.14 232.5,907.5 ; 232.53,907.53 cw(c276.14,863.86) 276.14,925.57 453.24,925.57 455.24,925.57 ccw(c455.24,929.57) 459.24,929.57 459.24,934.07 cw(c462.74,934.07) 466.24,934.07 466.24,917.07 ccw(c469.74,917.07) 473.24,917.07 473.24,934.07 cw(c476.74,934.07) 480.24,934.07 480.24,917.07 ccw(c483.74,917.07) 487.24,917.07 487.24,930.02 cw(c490.74,930.02) 494.24,930.02 494.24,921.57 ccw(c497.74,921.57) 501.24,921.57 cw(c505.24,921.57) 505.24,925.57 525.12,925.57 603.54,925.57 cw(c603.54,906.54) 617,920 629.63,907.37
FLASH_D12: U1.D15 U3.F5 | length 1020.5
  Top Layer w3: v2@284.37,875.63 v2(285,875)
  Top Layer w4: v2(515.31,861.41) 515.31,836.14 ccw(c536.94,836.14) 521.65,820.85 539.06,803.44 cw(c503.74,768.11) 553.69,768.11 ccw(c582.19,768.11) 562.03,747.97 589.39,720.61 cw(c563.79,695) 600,695 v2(600,595)
  Top Layer w10: U3.F5@265.63,876.26 266.26,875.63 v2@284.37,875.63 ; U1.D15@740.98,582.99 v7(756.73,598.74)
  Int3 (Sign) w3: v2(285,875) 386.52,875 388.02,875 ccw(c388.02,878) 391.02,878 391.02,884 cw(c394.02,884) 397.02,884 397.02,866 ccw(c400.02,866) 403.02,866 403.02,884 cw(c406.02,884) 409.02,884 409.02,866 ccw(c412.02,866) 415.02,866 415.02,884 cw(c418.02,884) 421.02,884 421.02,866 ccw(c424.02,866) 427.02,866 427.02,884 cw(c430.02,884) 433.02,884 433.02,866 ccw(c436.02,866) 439.02,866 439.02,884 cw(c442.02,884) 445.02,884 445.02,866 ccw(c448.02,866) 451.02,866 451.02,884 cw(c454.02,884) 457.02,884 457.02,866 ccw(c460.02,866) 463.02,866 463.02,883.93 cw(c466.02,883.93) 469.02,883.93 469.02,872 ccw(c472.02,872) 475.02,872 cw(c478.02,872) 478.02,875 482.51,875 cw(c482.51,828.61) 483.63,874.99 cw(c482.51,828.61) v2(515.31,861.41) ; v2(600,595) 640.87,595 cw(c640.87,579.64) 651.74,590.5 ccw(c662.24,600.5) 651.96,590.28 ccw(c662.24,600.5) 652.02,590.22 ccw(c662.24,600.5) 662.24,586 665,586 735,586 ccw(c735,607.71) 750.35,592.36 v7(756.73,598.74)
FLASH_D13: U1.E15 U3.H5 | length 1108.2
  Top Layer w4: v4(265,655) 255,665 253.59,666.41 ccw(c250.76,663.59) 247.93,666.41 244.75,663.23 cw(c242.27,665.71) 239.8,663.23 cw(c242.27,665.71) 239.8,668.18 251.82,680.2 ccw(c249.34,682.68) 251.82,685.15 ccw(c249.34,682.68) 246.87,685.15 243.69,681.97 cw(c240.86,684.8) 238.03,681.97 233.52,686.48 232.19,687.81 230,690 230,698.93 230,700 230,700.93 ccw(c226,700.93) 226,704.93 221.5,704.93 cw(c221.5,708.43) 221.5,711.93 238.5,711.93 ccw(c238.5,715.43) 238.5,718.93 221.5,718.93 cw(c221.5,722.43) 221.5,725.93 238.5,725.93 ccw(c238.5,729.43) 238.5,732.93 221.5,732.93 cw(c221.5,736.43) 221.5,739.93 235.3,739.93 ccw(c235.3,743.43) 235.3,746.93 234,746.93 cw(c234,750.93) 230,750.93 230,756.16 230.1,757.79 cw(c243.84,756.16) 230.49,759.79 cw(c243.84,756.16) 234.06,765.94 236.7,768.59 cw(c240.11,765.17) 240.11,770 ccw(c240.11,774) 244.11,774 244.11,778.5 cw(c247.61,778.5) 251.11,778.5 251.11,761.5 ccw(c254.61,761.5) 258.11,761.5 258.11,778.5 cw(c261.61,778.5) 265.11,778.5 265.11,761.63 ccw(c268.61,761.63) 272.11,761.63 272.11,766 cw(c276.11,766) 276.11,770 276.46,770 ccw(c276.46,778.54) 282.49,772.49 ccw(c276.46,778.54) 285,778.54 285,786.44 ccw(c276.41,786.44) 282.49,792.51 ccw(c270.4,780.44) 279.28,795.03 ccw(c270.4,780.44) 270.4,797.52 U3.H5@265.63,797.52
  Top Layer w10: U1.E15@740.98,551.5 740.98,551.85 756.38,567.24 v12(756.38,567.59)
  Int1 (Sign) w3: v4(265,655) ccw(c289.12,679.08) 289.12,645 348.56,645 350.06,645 ccw(c350.06,648) 353.06,648 353.06,651.63 cw(c356.06,651.63) 359.06,651.63 359.06,639 ccw(c362.06,639) 365.06,639 365.06,654 cw(c368.06,654) 371.06,654 371.06,639 ccw(c374.06,639) 377.06,639 377.06,653.67 cw(c380.06,653.67) 383.06,653.67 383.06,639.43 ccw(c386.06,639.43) 389.06,639.43 389.06,642 cw(c392.06,642) 392.06,645 410.65,645 570,645 cw(c570,608.79) 595.61,634.39 619.4,610.6 ccw(c632.93,624.14) 632.93,605 633.43,605 ccw(c633.43,620.85) 634.51,605.04 ccw(c633.43,620.85) 644.64,609.64 cw(c662.28,583.28) 656.53,614.47 cw(c662.28,583.28) 662.28,615 692.23,615 cw(c692.23,595.46) 693.45,614.96 cw(c692.23,595.46) 706.04,609.28 707.24,608.08 cw(c698.78,599.63) 710.74,599.63 ccw(c723.14,599.63) 714.37,590.86 716.65,588.58 ccw(c730.92,602.85) 730.92,582.67 731.93,582.67 cw(c731.93,560.04) 747.93,576.04 v12(756.38,567.59)
FLASH_D14: U1.E14 U3.G7 | length 1068.4
  Top Layer w4: v2(290,720) 300.91,730.91 ; 300.93,730.93 ccw(c261.61,770.2) 317.19,770.2 cw(c363.59,770.2) 330.78,803.02 ccw(c297.96,835.83) 344.37,835.83 U3.G7@344.37,836.89
  Top Layer w10: U1.E14@709.49,551.5 709.61,551.5 723.61,565.5 v12(723.73,565.5)
  Int1 (Sign) w3: v2(450,730) ccw(c474.06,754.06) 463.8,721.62 ccw(c474.06,754.06) 465.41,721.15 544.25,721.15 ccw(c544.25,732.67) 550.14,722.77 cw(c565.31,707.59) 565.31,729.05 632.42,729.05 cw(c632.42,710.18) 644.68,724.53 cw(c632.42,710.18) 645.76,723.53 647.26,723.53 ccw(c647.26,726.53) 650.26,726.53 650.26,732.53 cw(c653.26,732.53) 656.26,732.53 656.26,714.53 ccw(c659.26,714.53) 662.26,714.53 662.26,732.53 cw(c665.26,732.53) 668.26,732.53 668.26,714.53 ccw(c671.26,714.53) 674.26,714.53 674.26,732.53 cw(c677.26,732.53) 680.26,732.53 680.26,718.16 ccw(c683.26,718.16) 686.26,718.16 686.26,720.53 cw(c689.26,720.53) 689.26,723.53 704.96,723.53 759.14,723.53 cw(c759.14,682.86) 787.88,711.63 ; v12(723.73,565.5) 731.89,557.34 ccw(c749.62,575.07) 749.62,550 751.95,550 ccw(c751.95,569.43) 765.68,555.68 ccw(c748.22,573.14) 771.47,564.82 771.47,569.11 cw(c787.01,569.11) 785.51,584.58 cw(c787.01,569.11) 786.51,584.65 cw(c787.01,569.11) 787.01,584.66 ccw(c787.01,603.11) 795.15,586.55 ccw(c787.01,603.11) 798.1,588.36 ccw(c787.01,603.11) 800.04,590.04 ccw(c792.14,597.98) 803.34,597.98 cw(c816.84,597.98) 807.28,607.51 811.16,611.39 cw(c819.89,602.65) 819.89,615 ccw(c819.89,627.35) 828.61,618.61 ; 787.89,711.61 795.14,704.37 cw(c757.14,657.2) 800,700 830,670 cw(c817.93,657.93) 835,657.93 835,634.03 cw(c813.19,634.03) 828.63,618.63
  Int3 (Sign) w4: v2(290,720) 290,735.5 cw(c304,735.5) 304,749.5 402.92,749.5 cw(c402.92,682.92) v2(450,730)
FLASH_D15: U1.D17 U3.E7 | length 1110.7
  Top Layer w10: U3.E7@344.37,915.63 v4(365,895) ; U1.D17@803.98,582.99 v12(819.72,598.74)
  Int1 (Sign) w4: v4(365,895) 426.03,833.97 cw(c404.37,812.31) 435,812.31 435,793.23 ccw(c452.8,793.23) 440.21,780.64 ; 440.23,780.63 ccw(c452.8,793.23) 452.8,775.43 459.57,775.43 cw(c459.57,763.36) 466.57,773.19 cw(c459.57,763.36) 468.11,771.89 485.86,754.14 ccw(c512.11,780.4) 512.11,743.27 696.24,743.27 698.24,743.27 ccw(c698.24,747.27) 702.24,747.27 702.24,751 cw(c705.74,751) 709.24,751 709.24,734.77 ccw(c712.74,734.77) 716.24,734.77 716.24,751 cw(c719.74,751) 723.24,751 723.24,734.77 ccw(c726.74,734.77) 730.24,734.77 730.24,751 cw(c733.74,751) 737.24,751 737.24,734.77 ccw(c740.74,734.77) 744.24,734.77 744.24,751 cw(c747.74,751) 751.24,751 751.24,734.77 ccw(c754.74,734.77) 758.24,734.77 758.24,751 cw(c761.74,751) 765.24,751 765.24,734.77 ccw(c768.74,734.77) 772.24,734.77 772.24,751 cw(c775.74,751) 779.24,751 779.24,734.77 ccw(c782.74,734.77) 786.24,734.77 786.24,751 cw(c789.74,751) 793.24,751 793.24,734.77 ccw(c796.74,734.77) 800.24,734.77 800.24,747.48 cw(c803.74,747.48) 807.24,747.48 807.24,747.27 ccw(c811.24,747.27) 811.24,743.27 824.75,743.27 833,743.27 847.76,728.51 860.24,728.51 875,713.75 ; v12(819.72,598.74) 820.98,598.74 ccw(c820.98,687.34) 844.5,601.92 ccw(c820.98,687.34) 854.93,605.5 ccw(c820.98,687.34) 875.5,617.5 ccw(c855.88,637.12) 882.43,629.06 882.43,706.32 875,713.75 ; 877,712.04 ccw(c865,700) 875,713.75